# Altium PCB PCB1.pcbdoc
Units mil, origin at the board's own origin, x right, y up, seen from the top; angles counter-clockwise.
Board outline 3200.78 x 3145.96 mil, 2 copper layers (Top Layer, Bottom Layer); 10 components, 4 nets, 29 pads, 0 vias.
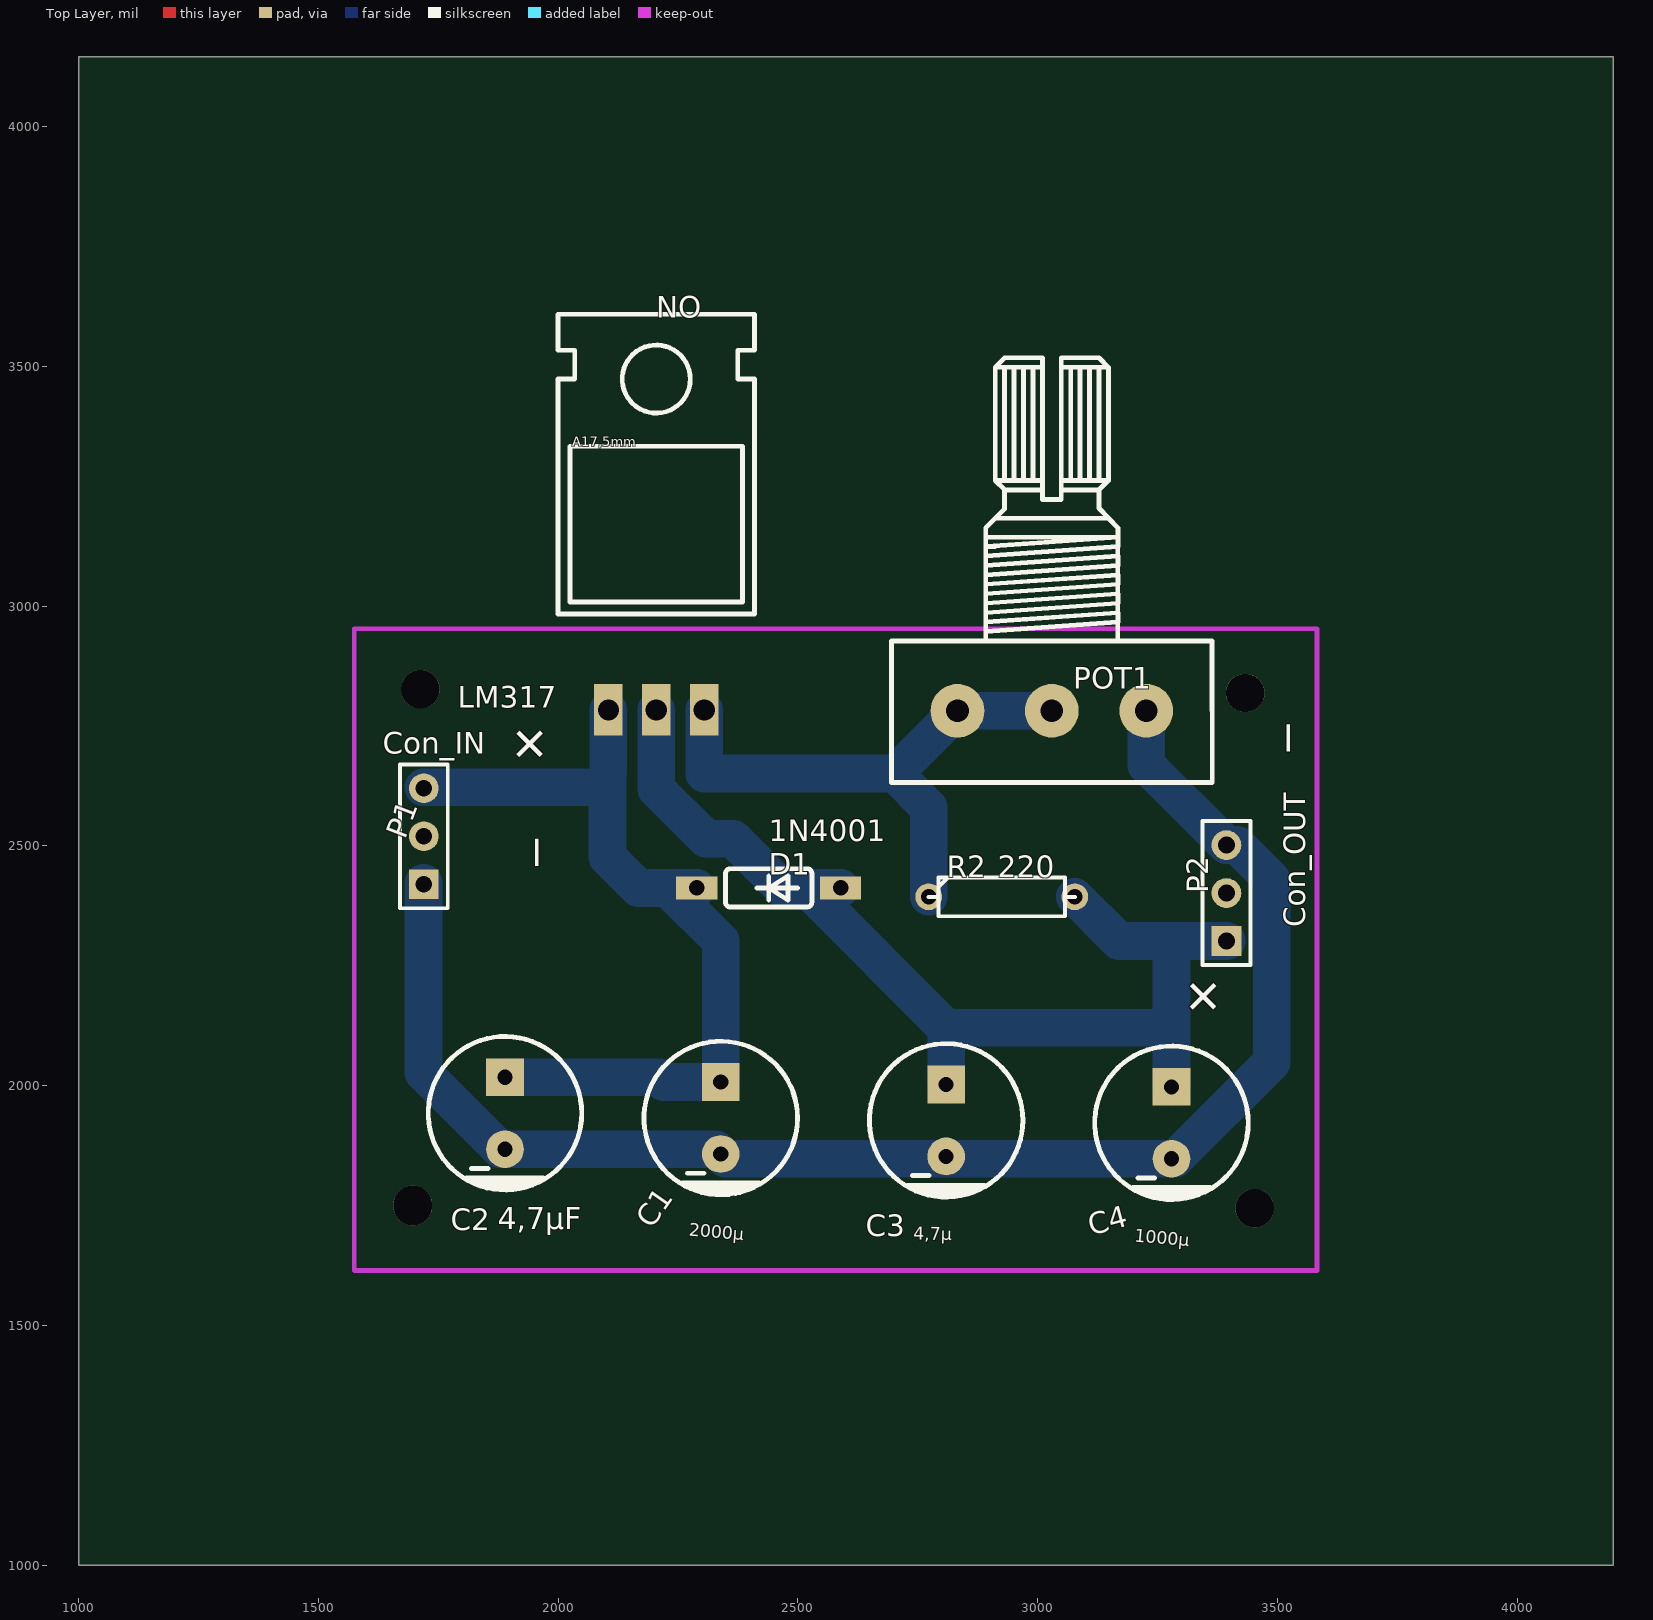
[diagram p0: Top Layer view]
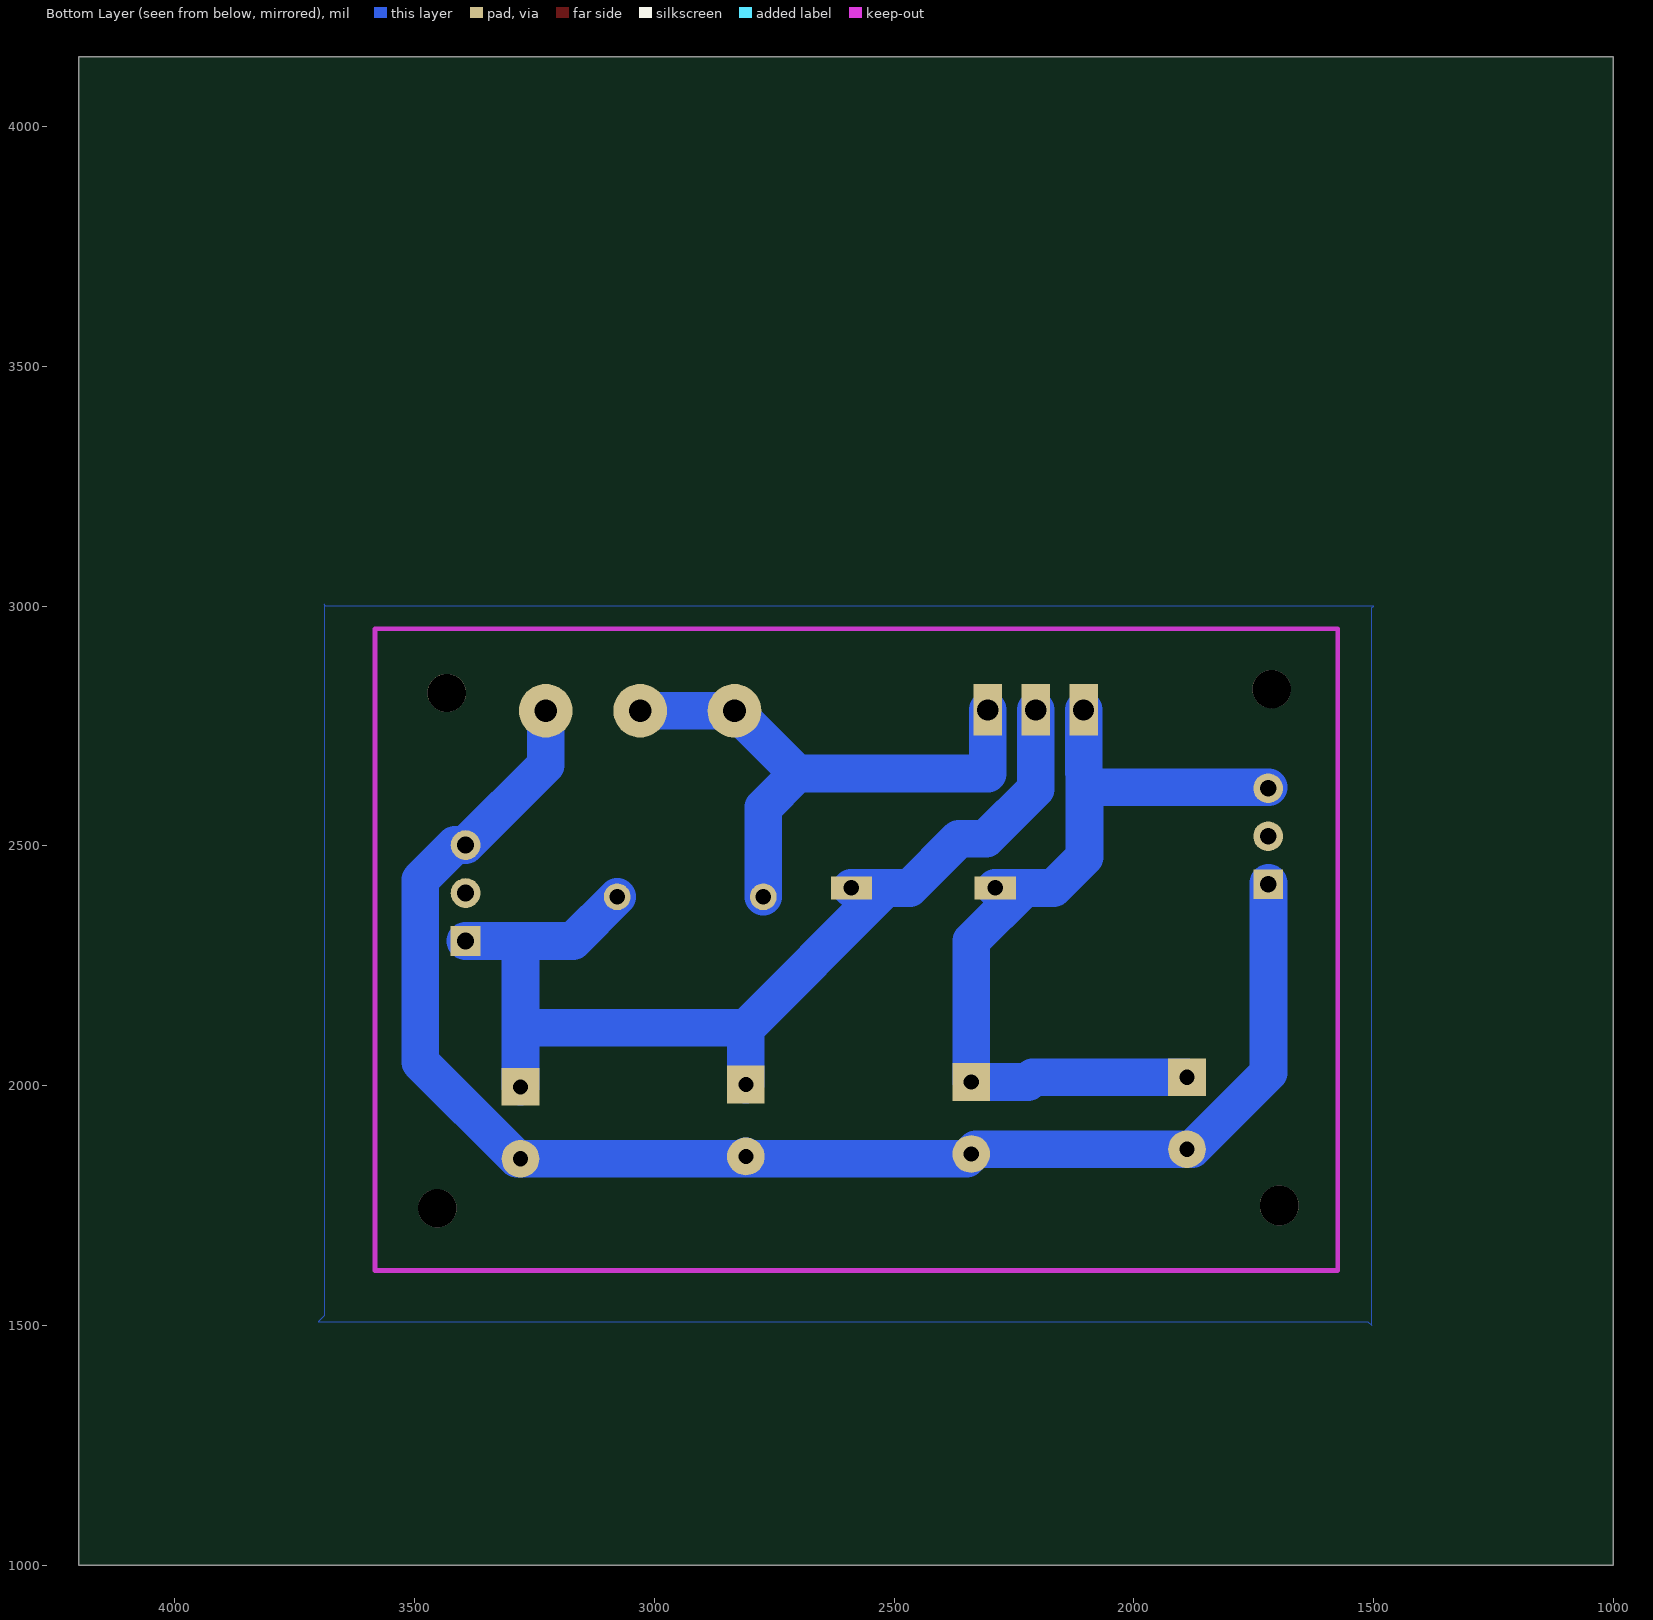
[diagram p1: Bottom Layer view, seen from below]

## Layer stack, top to bottom
Top Solder: solder mask 0.4, Solder Resist, Dk 3.5
Top Layer: signal copper 1.4
Dielectric1: dielectric 12.6, FR-4, Dk 4.8
Bottom Layer: signal copper 1.4
Bottom Solder: solder mask 0.4, Solder Resist, Dk 3.5

## Board outline
4200.78,1000 1000,1000 1000,4145.96 4200.78,4145.96

## Design rules (kind name [scope] priority, off if disabled: settings)
Clearance [All] p1: gap=10 ignorepadtopadclearanceinfootprint=FALSE
PolygonConnect [All] p1: connectstyle=Relief reliefconductorwidth=10 reliefentries=4 polygonreliefangle="90 Angle" airgapwidth=10
RoutingVias [All] p1: holewidth=28 width=50 viastyle="Through Hole" minholewidth=28 minwidth=50 maxholewidth=28 maxwidth=50
SolderMaskExpansion [All] p1: expansion=0 istentingtop=FALSE
Width [All] p1: maxlimit=10 minlimit=10 preferedwidth=10
30 further rules are at their usual default settings.

## Components (designator, comment, footprint, x,y, rotation, side; value= is the part's Value field where it differs from the comment)
C1 "2000µ" CP_8X13MM 2339.21,1932.36 r180 top
C2 "4,7µF" CP_8X13MM 1889.21,1942.36 r180 top
C3 "4,7µ" CP_8X13MM 2809.21,1927.36 r180 top
C4 "1000µ" CP_8X13MM 3279.21,1922.36 r180 top
D1 "1N4001" DO35-7 2439.21,2412.36 r0 top
NO "LM317" TO220 2204.72,2783.46 r0 top
P1 "Con_IN" HDR-3X1/2.54 1720,2520 r90 top
P2 "Con_OUT" HDR-3X1/2.54 3393.7,2401.57 r90 top
POT1 "5k" POTENCIOMETRO 3031.49,3011.81 r180 top
R2 "220" R3 2925.19,2393.7 r0 top

## Footprints (in the part's own frame and the unit in brackets; to place one, negate y for a bottom-side part, rotate by r counter-clockwise, add the part's x,y. Pads: shape width x height; smd on the part's side, far side on the other; paste and mask are expansions set on the pad)
CP_8X13MM [mil]
  rect 78.7x78.7 hole 31.6 paste-99999 mask+2: 1(0,-75)
  round 78.7 hole 31.6 paste-99999 mask+2: 2(0,75)
  silkscreen extent -160,-160 160,160
DO35-7 [mil]
  rect 85.9x47.7 hole 32 paste-99999 mask+2: A(150,0) C(-150,0)
  silkscreen extent -90,-40 90,40
HDR-3X1/2.54 [mil]
  rect 62x62 hole 35 paste-99999 mask+2: 1(-100,0)
  round 62 hole 35 paste-99999 mask+2: 2(0,0) 3(100,0)
  silkscreen extent -150,-50 150,50
POTENCIOMETRO [mil]
  round 112 hole 47.24 paste-99999 mask+4: 1(-195,230) 2(1.8,230.1) 3(198.7,230.2)
  silkscreen extent -333,-506 337,380
R3 [mil]
  round 55.9 hole 32.6 paste-99999 mask+2: 1(-152.4,0) 2(152.4,0)
  silkscreen extent -152,-41 152,41
TO220 [mil]
  rect 59.7x107.5 hole 44 paste-99999 mask+2: 1(-100,0) 2(0,0) 3(100,0)
  silkscreen extent -205,200 205,825

## Free pads (board coordinates)
  round 80 hole 80 unplated paste-99999: ""(1696.85,1748.03) ""(1696.85,1751.96) ""(1712.6,2826.77) ""(3433.06,2818.89) ""(3452.75,1744.09)

## Nets (pads, with @x,y where several pads share a name; then routed paths per layer and width w, separated by ;. In a path a pad name is that pad's centre, name@x,y a point inside that pad or via, vN(x,y) a via of type N, cw(c..) or ccw(c..) an arc to the next point about the centre after c; other vN are vias at no path point)
C3_1: C3.1 C4.1 D1.A NO.2 P2.1 R2.2 | length 2289.5
  Bottom Layer w78.74: NO.2 2204.72,2618.67 2308.41,2514.98 2364.87,2514.98 2467.49,2412.36 2528.35,2412.36 ; D1.A 2528.35,2412.36 ; C3.1 2809.21,2120.48 ; R2.2 3169.72,2301.57 3279.21,2301.57 ; C4.1 3279.21,2120.48 ; P2.1 3279.21,2301.57 ; 2528.35,2412.36 2528.35,2401.34 2809.21,2120.48 ; 2809.21,2120.48 3279.21,2120.48 ; 3279.21,2120.48 3279.21,2301.57
GND: C1.2 C2.2 C3.2 C4.2 P1.1 P2.3 POT1.1 | length 3226.9
  Bottom Layer w78.74: P1.1@1719.21,2422.36 1719.21,2026.93 1878.78,1867.36 C2.2 2329.21,1867.36 C1.2 2349.21,1847.36 2857.17,1847.36 ; C3.2 2814.21,1847.36 2857.17,1847.36 ; POT1.1 3226.49,2668.78 P2.3 3416.02,2501.57 3488.51,2429.08 3488.51,2049.33 3286.54,1847.36 C4.2 2857.17,1847.36
R2_1: NO.3 POT1.2 POT1.3 R2.1 | length 1198.2
  Bottom Layer w78.74: NO.3 2304.72,2650.94 2702.13,2650.94 ; R2.1 2772.79,2580.28 2702.13,2650.94 ; POT1.2 3029.59,2781.6 POT1.3 2702.13,2650.94
VCC: C1.1 C2.1 D1.C NO.1 P1.3 | length 1809.1
  Bottom Layer w78.74: P1.3@1719.21,2622.36 2102.9,2622.36 ; C2.1 2211.09,2017.36 2221.09,2007.36 C1.1 2339.21,2301.5 2228.35,2412.36 ; NO.1 2104.72,2652.76 2102.9,2650.94 2102.9,2622.36 ; D1.C 2228.35,2412.36 ; 2102.9,2622.36 2102.9,2476.95 2167.49,2412.36 2228.35,2412.36
pads on no net: P1.2 P2.2

## Polygon pours and split planes (outlines as drawn)
GND on Bottom Layer "Bottom Layer-GND" (solid, pour order 0): 1503.94,3000 3685.03,3000 3688.97,3003.93 3688.97,1519.68 3700.78,1507.87 1511.81,1507.87 1503.94,1500 1503.94,2996.06 1500,3000

## Silkscreen, mask and mechanical layers (free items; w line width, h text height)
Top Overlay:
  text "+" at 1998.11,2704.43 h80 r135
  text "_" at 3500.62,2696.84 h80 r90
  text "_" at 1933.67,2458 h80 r90
  text "+" at 3402.3,2177.89 h80 r135

## Text inside footprints (layer, text, board x,y; h text height)
NO: Top Overlay "A17,5mm" at 2029.72,3333.46 h20; Document "1" at 2079.72,3048.46 h30 r180; Document "2" at 2179.72,3048.46 h30 r180; Document "3" at 2279.72,3048.46 h30 r180